# Altium PCB PCB1.PcbDoc (part 2 of 3)
Units mm, origin at the board's own origin, x right, y up, seen from the top; angles counter-clockwise.
Board outline 131 x 74 mm, 6 copper layers (Top Layer, Rele, Signals, +5V, GND, Bottom Layer), stack 1.732 mm thick; 176 components, 158 nets, 639 pads, 196 vias.
Unrouted connection lines stored in the file: 8.
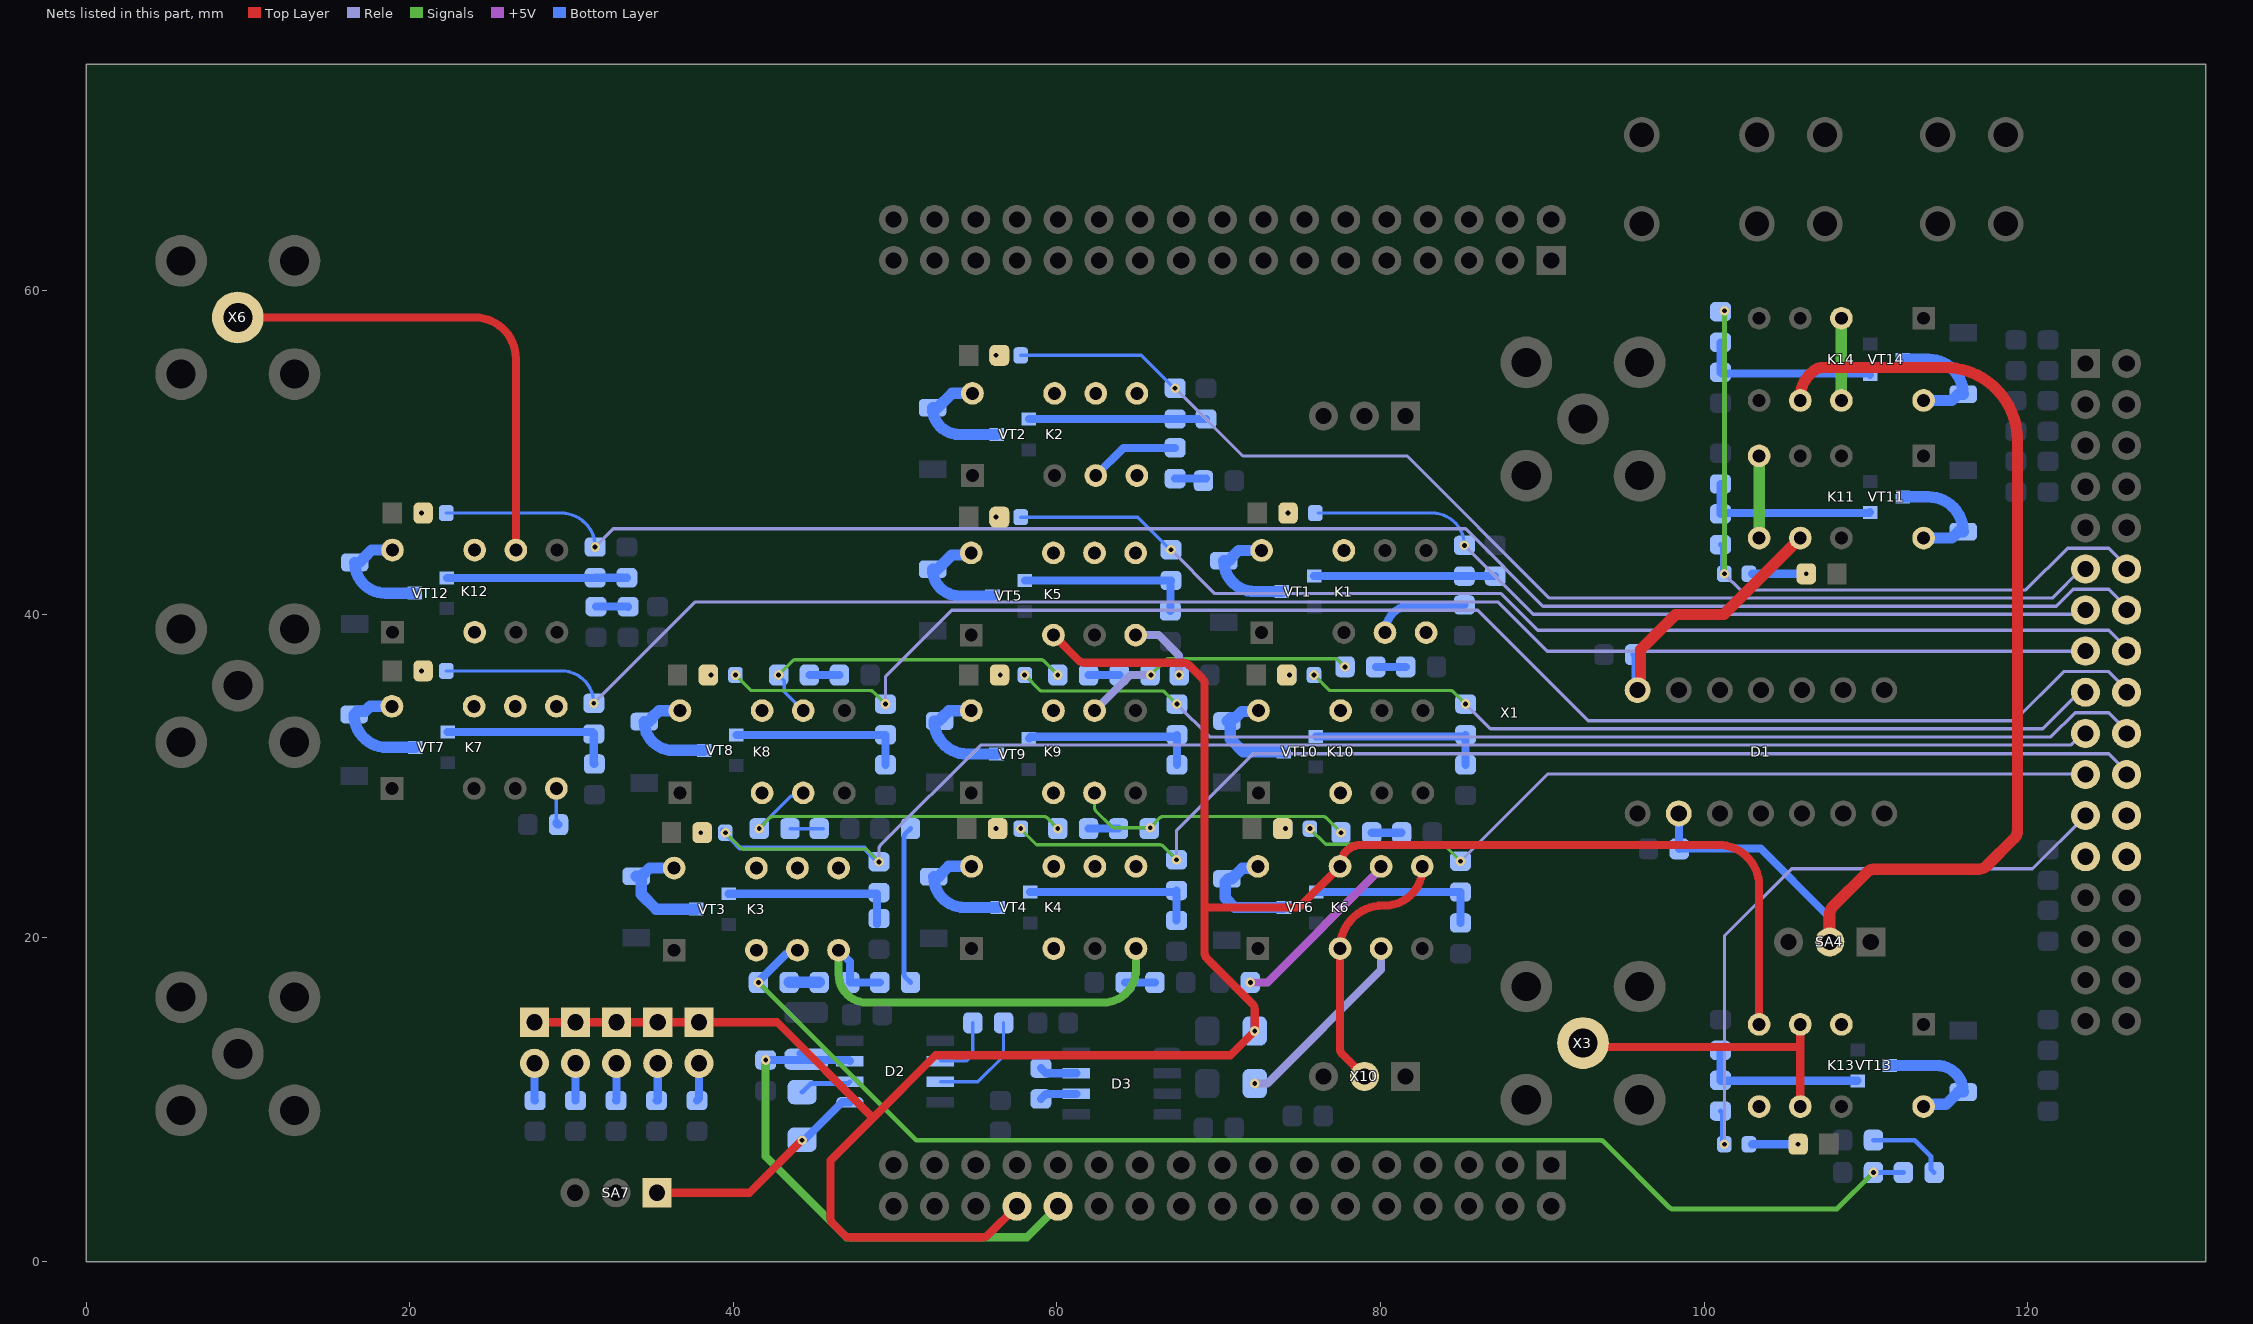
[diagram p6: the nets of this part, all layers, seen from the top]

## Via types
v1: diameter 0.6, hole 0.3, Top Layer to Bottom Layer, tented both sides, 196 vias

## Nets (pads, with @x,y where several pads share a name; then routed paths per layer and width w, separated by ;. In a path a pad name is that pad's centre, name@x,y a point inside that pad or via, vN(x,y) a via of type N, cw(c..) or ccw(c..) an arc to the next point about the centre after c; other vN are vias at no path point) (continued)
LOAD_BUF: D2.1 R25.1 SA7.1 | length 14.2
  Top Layer w0.5: SA7.1@35.29,4.25 41,4.25 v1(44.25,7.5)
  Bottom Layer w0.5: R25.1@44.25,7.53 44.4,7.53 46.715,9.845 D2.1@47.2,9.845
LOAD_F: C12.1 C13.1 D2.3 X1.37 | length 32.7
  Signals w0.5: v1(42,12.45) 42,6.5 47,1.5 58.14,1.5 X1.37@60.059,3.419
  Bottom Layer w0.5: v1(42,12.45) 44.5,12.45 C13.1@44.5,12.5 ; C13.1@44.146,12.854 C13.1@44.5,12.5 ; D2.3@47.2,12.385 47.143,12.443 44.557,12.443 C13.1@44.5,12.5
NetC9_1: C9.1 K2.4 | length 5.6
  Bottom Layer w0.5: K2.4@62.396,48.57 64.108,50.282 C9.1@67.299,50.282
NetC9_2: C9.2 R7.1 | length 1.9
  Bottom Layer w0.5: C9.2@67.299,48.382 R7.1@69.204,48.382
NetC10_1: C10.1 R8.2 | length 2
  Bottom Layer w0.5: C10.1@31.512,40.472 33.478,40.472 cw(c33.478,40.45) R8.2@33.5,40.45
NetC11_2: C11.2 R16.1 | length 1.9
  Bottom Layer w0.5: R16.1@64.2,17.25 C11.2@66.05,17.25
NetC16_2: C16.2 K3.4 R33.1 R83.2 | length 80.7
  Signals w0.3: v1(41.55,17.25) 51.3,7.5 93.563,7.5 cw(c93.563,7.2) 93.775,7.412 97.851,3.337 ccw(c98.062,3.55) 98.06,3.25 98.062,3.25 108.2,3.25 v1(110.45,5.5)
  Bottom Layer w0.3: v1(110.45,5.5) R83.2@112.3,5.5
  Bottom Layer w0.5: v1(41.55,17.25) 41.55,17.3 43.278,19.028 43.753,19.028 K3.4@43.963,19.238
NetD2_2: D2.2 R25.2 | length 3.2
  Bottom Layer w0.3: R25.2@44.25,10.47 44.78,11 47.085,11 D2.2@47.2,11.115
NetD2_6: D2.6 R26.1 | length 4.1
  Bottom Layer w0.2: D2.6@52.8,12.385 54.385,12.385 54.8,12.8 R26.1@54.8,14.75
NetD2_7: D2.7 R26.2 | length 6.6
  Bottom Layer w0.2: D2.7@52.8,11.115 55.115,11.115 56.7,12.7 R26.2@56.7,14.75
NetD3_6: D3.6 R27.1 | length 2.3
  Bottom Layer w0.5: R27.1@59,10.05 59.315,10.365 D3.6@61.2,10.365
NetD3_7: D3.7 R27.2 | length 2.3
  Bottom Layer w0.5: R27.2@59,11.95 59.315,11.635 D3.7@61.2,11.635
NetK1_4: K1.4 R6.1 | length 5.9
  Bottom Layer w0.5: K1.4@80.269,38.862 cw(c81.981,38.862) 81.981,40.574 R6.1@85.172,40.574
NetK1_5: K1.5
NetK1_10: K1.10
NetK1_12: K1.12 VD1.1 VT1.3 | length 7.3
  Bottom Layer w0.7: K1.12@72.649,43.942 71.223,43.942 70.813,43.532 70.813,43.502 70.613,43.302 VD1.1@70.313,43.302 ccw(c72.213,43.302) 72.213,41.402 VT1.3@73.885,41.402
NetK2_5: K2.5
NetK2_8: K2.8
NetK2_9: K2.9
NetK2_10: K2.10
NetK2_12: K2.12 VD3.1 VT2.3 | length 7.7
  Bottom Layer w0.7: K2.12@54.776,53.65 53.507,53.65 52.613,52.756 VD3.1@52.313,52.756 ccw(c53.959,52.756) 53.959,51.11 VT2.3@56.266,51.11
NetK3_3: K3.3
NetK3_8: K3.8
NetK3_9: K3.9
NetK3_10: K3.10
NetK3_12: K3.12 VD5.1 VT3.3 | length 7.5
  Bottom Layer w0.7: VD5.1@34.007,23.805 34.307,23.805 34.82,24.318 K3.12@36.343,24.318 ; VD5.1@34.107,23.805 34.307,23.605 34.307,22.693 35.222,21.778 VT3.3@37.706,21.778
NetK4_3: K4.3
NetK4_8: K4.8
NetK4_9: K4.9
NetK4_10: K4.10
NetK4_12: K4.12 VD7.1 VT4.3 | length 7.7
  Bottom Layer w0.7: K4.12@54.72,24.42 53.294,24.42 52.884,24.01 52.884,23.98 52.684,23.78 VD7.1@52.384,23.78 ccw(c54.284,23.78) 54.284,21.88 VT4.3@56.337,21.88
NetK5_5: K5.5 R17.2 | length 4.4
  Rele w0.5: K5.5@64.86,38.71 66.29,38.71 67.55,37.45 v1(67.55,36.25)
NetK5_8: K5.8
NetK5_9: K5.9
NetK5_10: K5.10
NetK5_12: K5.12 VD9.1 VT5.3 | length 7.4
  Bottom Layer w0.7: K5.12@54.7,43.79 54.566,43.656 53.496,43.656 52.617,42.777 VD9.1@52.317,42.777 ccw(c53.963,42.777) 53.963,41.131 VT5.3@56.016,41.131
NetK6_3: K6.3 K6.8 X10.2 | length 16.5
  Top Layer w0.5: K6.3@77.49,19.34 77.49,13.16 ccw(c77.99,13.16) 77.636,12.807 X10.2@79,11.443 ; K6.3@77.49,19.349 cw(c80.141,19.349) 80.141,22.001 80.269,22.001 ccw(c80.271,24.302) 82.57,24.417 K6.8@82.57,24.42
NetK6_4: K6.4 R9.1 | length 12
  Rele w0.5: v1(72.22,11) 73,11 80.03,18.03 K6.4@80.03,19.34
NetK6_12: K6.12 VD11.1 VT6.3 | length 7.2
  Bottom Layer w0.7: K6.12@72.41,24.42 72.293,24.303 71.453,24.303 70.803,23.653 70.602,23.653 70.399,23.45 70.399,22.46 70.979,21.88 VT6.3@73.977,21.88
NetK7_5: K7.5 R18.1 | length 2.3
  Bottom Layer w0.2: R18.1@29.063,27.137 K7.5@29.063,29.232
  Bottom Layer w0.5: R18.1@29.063,27.137 ccw(c29.2,27.137) R18.1@29.2,27
NetK7_8: K7.8
NetK7_9: K7.9
NetK7_10: K7.10
NetK7_12: K7.12 VD13.1 VT7.3 | length 7.5
  Bottom Layer w0.7: K7.12@18.903,34.312 18.897,34.318 17.568,34.318 17.249,33.999 16.767,33.999 VD13.1@16.567,33.799 ccw(c18.594,33.799) 18.594,31.772 VT7.3@20.343,31.772
NetK8_3: K8.3
NetK8_4: K8.4 R21.1 R79.2 | length 22.7
  Signals w0.2: v1(41.6,26.75) 42.292,27.442 cw(c42.433,27.3) 42.432,27.5 ; 42.433,27.5 59.217,27.5 cw(c59.217,27.3) 59.358,27.442 v1@60.049,26.751
  Bottom Layer w0.2: v1(41.6,26.75) 41.6,26.8 43.55,28.75 44.11,28.75 K8.4@44.32,28.96
  other v1: 60.05,26.75
NetK8_9: K8.9 R12.1 R77.2 | length 20.8
  Signals w0.2: v1(42.8,36.25) 43.678,37.128 cw(c43.819,36.986) 43.818,37.186 ; 43.819,37.186 59.031,37.186 cw(c59.031,36.986) 59.172,37.128 60.049,36.251 cw(c59.837,36.039) v1(60.05,36.25)
  Bottom Layer w0.2: v1(42.8,36.25) 43.15,35.9 43.15,35.21 K8.9@44.32,34.04
NetK8_10: K8.10
NetK8_12: K8.12 VD15.1 VT8.3 | length 7.2
  Bottom Layer w0.7: K8.12@36.7,34.04 35.402,34.04 34.992,33.63 34.992,33.563 34.792,33.363 VD15.1@34.492,33.363 ccw(c36.265,33.363) 36.265,31.59 VT8.3@38.191,31.59
NetK9_3: K9.3
NetK9_4: K9.4 R22.1 R80.2 | length 17.4
  Signals w0.2: K9.4@62.32,28.96 62.32,28.054 ccw(c62.62,28.054) 62.407,27.843 63.353,26.897 ccw(c63.564,27.11) 63.563,26.81 v1(65.76,26.81) 66.392,27.442 cw(c66.533,27.3) 66.532,27.5 ; 66.533,27.5 76.467,27.5 cw(c76.467,27.3) 76.608,27.442 77.493,26.557 v1(77.55,26.5)
NetK9_9: K9.9 R13.1 R78.2 | length 17
  Signals w0.2: v1(65.8,36.25) 66.742,37.192 cw(c66.883,37.05) 66.882,37.25 ; 66.883,37.25 77.217,37.25 cw(c77.217,37.05) 77.358,37.192 77.786,36.764 v1(77.8,36.75)
  Rele w0.5: K9.9@62.32,34.04 64.53,36.25 v1(65.8,36.25)
NetK9_10: K9.10
NetK9_12: K9.12 VD17.1 VT9.3 | length 7.6
  Bottom Layer w0.7: K9.12@54.7,34.04 53.318,34.04 52.908,33.63 52.908,33.6 52.708,33.4 52.408,33.4 ccw(c54.448,33.4) 54.448,31.36 VT9.3@56.26,31.36
NetK10_3: K10.3
NetK10_10: K10.10
NetK10_12: K10.12 VD19.1 VT10.3 | length 7
  Bottom Layer w0.7: VD19.1@70.5,33.4 70.512,33.4 70.712,33.2 70.712,32.288 71.5,31.5 VT10.3@74,31.5 ; VD19.1@70.55,33.4 70.75,33.6 71.028,33.6 71.421,33.994 72.404,33.994 K10.12@72.45,34.04
NetK11_5: K11.5 K11.8 | length 5.1
  Signals w0.7: K11.8@103.39,44.71 K11.5@103.39,49.79
NetK11_12: K11.12 VD21.1 VT11.3 | length 7.6
  Bottom Layer w0.7: VT11.3@112.25,47.25 113.85,47.25 cw(c113.85,45.1) VD21.1@116,45.1 115.7,45.1 115.31,44.71 K11.12@113.55,44.71
NetK12_3: K12.3
NetK12_10: K12.10
NetK12_12: K12.12 VD23.1 VT12.3 | length 7.4
  Bottom Layer w0.7: K12.12@18.939,43.967 17.649,43.967 17.2,43.518 17.2,43.497 16.903,43.2 VD23.1@16.603,43.2 ccw(c18.503,43.2) 18.503,41.3 VT12.3@20.302,41.3
NetK13_3: K13.3
NetK13_8: K13.8
NetK13_12: K13.12 VD25.1 VT13.3 | length 8.3
  Bottom Layer w0.7: VT13.3@111.47,12.12 114.354,12.12 cw(c114.354,10.474) VD25.1@116,10.474 115.7,10.474 114.94,9.714 113.684,9.714 K13.12@113.55,9.58
NetK14_3: K14.3 K14.10 | length 5.1
  Signals w0.7: K14.10@108.47,53.21 K14.3@108.47,58.29
NetK14_12: K14.12 VD27.1 VT14.3 | length 7.6
  Bottom Layer w0.7: VT14.3@112.25,55.75 113.85,55.75 cw(c113.85,53.6) VD27.1@116,53.6 115.7,53.6 115.31,53.21 K14.12@113.55,53.21
NetR11_1: R11.1 R12.2 | length 1.9
  Bottom Layer w0.5: R12.2@44.7,36.25 R11.1@46.55,36.25
NetR13_2: R13.2 R77.1 | length 1.9
  Bottom Layer w0.5: R77.1@61.95,36.25 R13.2@63.85,36.25
NetR14_2: R14.2 R78.1 | length 1.9
  Bottom Layer w0.5: R78.1@79.7,36.75 R14.2@81.55,36.75
NetR20_1: R20.1 R21.2 | length 2.1
  Bottom Layer w0.2: R21.2@43.5,26.75 R20.1@45.55,26.75
NetR22_2: R22.2 R79.1 | length 1.9
  Bottom Layer w0.5: R79.1@61.95,26.75 R22.2@63.8,26.75
NetR23_2: R23.2 R80.1 | length 1.9
  Bottom Layer w0.5: R80.1@79.45,26.5 R23.2@81.3,26.5
NetR24_1: R24.1 SA1.2 | length 2.3
  Bottom Layer w0.5: SA1.2@27.71,12.25 27.71,9.95 R24.1@27.75,9.95
NetR28_1: R28.1 SA2.2 | length 2.3
  Bottom Layer w0.5: R28.1@30.25,9.95 SA2.2@30.25,12.25
NetR29_1: R29.1 SA3.2 | length 2.3
  Bottom Layer w0.5: R29.1@32.75,9.95 32.79,9.95 SA3.2@32.79,12.25
NetR30_1: R30.1 SA5.2 | length 2.4
  Bottom Layer w0.5: R30.1@35.25,9.95 35.33,9.95 SA5.2@35.33,12.25
NetR31_1: R31.1 SA6.2 | length 2.3
  Bottom Layer w0.5: R31.1@37.75,9.95 37.87,10.07 SA6.2@37.87,12.25
NetR32_2: R32.2 R81.1 | length 9.8
  Bottom Layer w0.3: R32.2@50.634,17.566 R32.2@50.95,17.25 ; R32.2@50.633,17.567 cw(c50.846,17.778) 50.546,17.778 50.546,26.222 cw(c50.846,26.222) 50.634,26.434 R81.1@50.95,26.75
NetR33_2: R33.2 R82.1 | length 1.9
  Bottom Layer w0.7: R33.2@43.45,17.25 R82.1@45.3,17.25
NetR34_2: R34.2 R83.1 | length 5
  Bottom Layer w0.3: R34.2@110.45,7.5 113,7.5 114,6.5 114,5.7 R83.1@114.2,5.5
NetR35_2: R35.2 R36.1 VT1.1 | length 11.2
  Bottom Layer w0.5: VT1.1@75.885,42.352 85.172,42.352 87.077,42.352 R36.1@87.077,42.357
NetR37_2: R37.2 VD2.1
  other v1: 74.28,46.25
NetR38_2: R38.2 R39.1 VT2.1 | length 10.9
  Bottom Layer w0.5: VT2.1@58.266,52.06 58.268,52.062 67.296,52.062 R38.2@67.299,52.065 R39.1@69.204,52.065
NetR40_2: R40.2 VD4.1
  other v1: 56.24,56
NetR41_2: R41.2 R42.1 VT3.1 | length 11
  Bottom Layer w0.5: VT3.1@39.706,22.728 R41.2@48.866,22.728 ; R42.1@48.866,20.851 R41.2@48.866,22.728 ; R41.2@48.866,22.733 R41.2@48.866,22.728
NetR43_2: R43.2 VD6.1
  other v1: 37.99,26.5
NetR44_2: R44.2 R45.1 VT4.1 | length 10.9
  Bottom Layer w0.5: VT4.1@58.337,22.83 67.295,22.83 R44.2@67.391,22.926 R45.1@67.391,21.076
NetR46_2: R46.2 VD8.1
  other v1: 56.24,26.75
NetR47_2: R47.2 R48.1 VT5.1 | length 10.9
  Bottom Layer w0.5: VT5.1@58.016,42.081 58.018,42.083 R47.2@67.046,42.083 ; R48.1@67,40.2 67.024,40.224 67.024,42.061 R47.2@67.046,42.083 ; R47.2@67.049,42.086 R47.2@67.046,42.083
NetR49_2: R49.2 VD10.1
  other v1: 56.24,46
NetR50_2: R50.2 R51.1 VT6.1 | length 10.8
  Bottom Layer w0.5: VT6.1@76.027,22.83 76.03,22.833 84.931,22.833 R50.2@84.933,22.835 R51.1@84.933,20.925
NetR52_2: R52.2 VD12.1
  other v1: 74.11,26.75
NetR53_2: R53.2 R54.1 VT7.1 | length 11
  Bottom Layer w0.5: VT7.1@22.343,32.722 31.254,32.722 cw(c31.254,32.6) R53.2@31.376,32.6 31.376,30.782 ccw(c31.408,30.782) R54.1@31.408,30.75
NetR55_2: R55.2 VD14.1
  other v1: 20.74,36.5
NetR56_2: R56.2 R57.1 VT8.1 | length 11.1
  Bottom Layer w0.5: VT8.1@40.191,32.54 40.196,32.545 49.403,32.545 R56.2@49.408,32.55 R57.1@49.408,30.7
NetR58_2: R58.2 VD16.1
  other v1: 38.61,36.25
NetR59_2: R59.2 R60.1 VT9.1 | length 11.1
  Bottom Layer w0.5: VT9.1@58.26,32.31 58.38,32.43 67.288,32.43 R59.2@67.408,32.55 R60.1@67.408,30.7
NetR61_2: R61.2 VD18.1
  other v1: 56.49,36.25
NetR62_2: R62.2 R63.1 VT10.1 | length 11.2
  Bottom Layer w0.5: VT10.1@76,32.45 85.15,32.45 ccw(c85.15,32.55) R62.2@85.25,32.55 R63.1@85.25,30.7
NetR64_2: R64.2 VD20.1
  other v1: 74.36,36.25
NetR65_2: R65.2 R66.1 VT11.1 | length 11.1
  Bottom Layer w0.5: R66.1@101,48.05 R65.2@101,46.2 101.05,46.25 110.2,46.25 VT11.1@110.25,46.3
NetR67_2: R67.2 VD22.1 | length 3.4
  Bottom Layer w0.5: R67.2@102.95,42.5 v1(106.3,42.5)
NetR68_2: R68.2 R69.1 VT12.1 | length 11.1
  Bottom Layer w0.5: VT12.1@22.302,42.25 R68.2@31.457,42.25 ; R68.2@31.462,42.255 R69.1@33.417,42.255
NetR70_2: R70.2 VD24.1
  other v1: 20.74,46.25
NetR71_2: R71.2 R72.1 VT13.1 | length 10.3
  Bottom Layer w0.5: R72.1@101,13.05 R71.2@101,11.2 ccw(c101.03,11.2) 101.03,11.17 VT13.1@109.47,11.17
NetR73_2: R73.2 VD26.1 | length 2.8
  Bottom Layer w0.5: R73.2@102.95,7.25 v1(105.8,7.25)
NetR74_2: R74.2 R75.1 VT14.1 | length 11.2
  Bottom Layer w0.5: R74.2@101,56.8 R75.1@101,54.95 101.075,54.875 110.175,54.875 VT14.1@110.25,54.8
NetR76_2: 
NetX1_IN-OUT7: X1.IN-OUT7
NetX1_IN-OUT8: X1.IN-OUT8
NetX1_OUT8: X1.OUT8
OSC: K12.9 X6.1 | length 30.5
  Top Layer w0.5: X6.1@9.38,58.339 24.019,58.339 cw(c24.019,55.799) 26.559,55.799 K12.9@26.559,43.967
OUT: K5.3 K6.10 K13.5 R15.1 SA1.1 SA2.1 SA3.1 SA5.1 SA6.1 X1.36 | length 148.7
  Top Layer w0.5: SA1.1@27.71,14.79 SA3.1@32.79,14.79 SA5.1@35.33,14.79 SA6.1@37.87,14.79 39.37,14.79 42.71,14.79 48.625,8.875 ; X1.36@57.519,3.419 55.746,1.646 cw(c55.393,2) 55.393,1.5 47.206,1.5 cw(c47.207,2) 46.855,1.645 46.146,2.354 cw(c46.5,2.707) 46,2.707 46,6.25 48.625,8.875 ; K5.3@59.78,38.71 61.344,37.146 61.345,37.145 ccw(c61.697,37.5) 61.697,37 67.793,37 cw(c67.793,36.5) 68.147,36.853 68.981,36.019 cw(c68.627,35.666) 69.127,35.666 69.127,21.88 ; K13.5@103.39,14.66 103.39,23.21 ccw(c100.85,23.21) 100.85,25.75 78.82,25.75 ccw(c78.82,24.42) K6.10@77.49,24.42 75.096,22.026 cw(c74.743,22.38) 74.743,21.88 69.127,21.88 ; 48.625,8.875 52.5,12.75 70.72,12.75 v1(72.22,14.25) 72.22,15.573 ccw(c71.72,15.573) 72.074,15.926 69.273,18.727 cw(c69.627,19.08) 69.127,19.08 69.127,21.88
RELE1: R38.1 R40.1 X1.OUT1 | length 72.9
  Rele w0.2: v1(67.299,53.965) 71.486,49.778 81.651,49.778 90.429,41 121.5,41 123.327,42.827 X1.OUT1@123.71,42.827
  Bottom Layer w0.2: R40.1@57.76,56 65.214,56 67.249,53.965 v1(67.299,53.965)
RELE2: R65.1 R67.1 R74.1 X1.IN-OUT1 | length 45.2
  Signals w0.3: v1(101.24,42.5) 101.245,42.505 101.245,58.745 v1(101.25,58.75)
  Rele w0.2: v1@101.24,42.481 102.221,41.5 119.872,41.5 122.45,44.077 125,44.077 X1.IN-OUT1@126.25,42.827
  Bottom Layer w0.3: R65.1@101,44.3 101.12,44.18 101.12,42.62 v1(101.24,42.5)
RELE3: R35.1 R37.1 X1.OUT2 | length 50.4
  Rele w0.2: v1(85.172,44.257) 89.429,40 123.3,40 X1.OUT2@123.559,40.259
  Bottom Layer w0.2: R37.1@76.15,46.25 83.179,46.25 cw(c83.179,44.257) v1(85.172,44.257)
RELE4: R68.1 R70.1 X1.IN-OUT2 | length 108.6
  Rele w0.2: v1(31.462,44.155) 32.585,45.278 85.249,45.278 90.027,40.5 121.75,40.5 122.787,41.537 125,41.537 X1.IN-OUT2@126.25,40.287
  Bottom Layer w0.2: R70.1@22.26,46.25 29.367,46.25 cw(c29.367,44.155) v1(31.462,44.155)
RELE5: R53.1 R55.1 X1.OUT3 | length 106.3
  Rele w0.2: v1(31.376,34.5) 37.626,40.75 87.265,40.75 90.296,37.719 X1.OUT3@123.559,37.719
  Bottom Layer w0.2: R55.1@22.26,36.5 29.376,36.5 cw(c29.376,34.5) v1(31.376,34.5)
RELE6: R47.1 R49.1 X1.IN-OUT3 | length 71.9
  Rele w0.2: v1(67.049,43.986) 69.757,41.278 87.444,41.278 89.713,39.009 124.988,39.009 X1.IN-OUT3@126.25,37.747
  Bottom Layer w0.2: R49.1@57.76,46 64.985,46 66.999,43.986 v1(67.049,43.986)
RELE7: R62.1 R64.1 X1.OUT4 | length 50.1
  Signals w0.2: v1(75.88,36.25) 76.85,35.28 84.337,35.28 cw(c84.337,35.08) 84.478,35.222 v1(85.25,34.45)
  Rele w0.2: v1(85.25,34.45) 86.783,32.917 120.917,32.917 123.207,35.207 X1.OUT4@123.71,35.207
RELE8: R56.1 R58.1 X1.IN-OUT4 | length 94.9
  Signals w0.2: v1(40.13,36.25) 41.1,35.28 48.454,35.28 cw(c48.454,34.98) 48.666,35.192 v1(49.408,34.45)
  Rele w0.2: v1(49.408,34.45) 49.408,36.158 53.5,40.25 86,40.25 92.833,33.417 119.167,33.417 122.207,36.457 125,36.457 X1.IN-OUT4@126.25,35.207
RELE9: R41.1 R43.1 X1.OUT5 | length 99.3
  Signals w0.2: v1@39.439,26.571 v1(39.51,26.5) 40.423,25.587 ccw(c40.634,25.8) 40.633,25.5 48.117,25.5 cw(c48.117,25.3) 48.258,25.442 v1(49,24.7)
  Rele w0.2: v1(49,24.7) 49,25.503 cw(c49.3,25.503) 49.088,25.715 55.29,31.917 122.633,31.917 123.383,32.667 X1.OUT5@123.71,32.667
  Bottom Layer w0.3: R43.1@39.34,26.67 v1(39.51,26.5) 39.51,26.45 39.96,26 40.41,25.55 48.1,25.55 48.866,24.784 R41.1@48.866,24.633
RELE10: R59.1 R61.1 X1.IN-OUT5 | length 71
  Signals w0.2: v1(58,36.25) 58.942,35.308 ccw(c59.083,35.45) 59.082,35.25 66.525,35.25 cw(c66.525,35.05) 66.666,35.192 v1@67.408,34.451
  Rele w0.2: v1(67.408,34.45) 69.441,32.417 121.417,32.417 122.917,33.917 125,33.917 X1.IN-OUT5@126.25,32.667
RELE11: R50.1 R52.1 X1.OUT6 | length 51.1
  Signals w0.2: v1(75.63,26.75) 76.6,25.78 83.805,25.78 cw(c83.805,25.58) 83.946,25.722 v1(84.933,24.735)
  Rele w0.2: v1(84.933,24.735) 90.325,30.127 X1.OUT6@123.71,30.127
RELE12: R44.1 R46.1 X1.IN-OUT6 | length 73.6
  Signals w0.2: v1(57.76,26.75) 57.796,26.714 ccw(c57.985,26.779) 57.843,26.638 58.673,25.808 ccw(c58.814,25.95) 58.813,25.75 66.384,25.75 cw(c66.384,25.55) 66.526,25.691 v1(67.391,24.826)
  Rele w0.2: v1(67.391,24.826) 67.391,26.641 72.125,31.375 125.001,31.375 X1.IN-OUT6@126.25,30.127
RELE13: R71.1 R73.1 X1.OUT7 | length 40.4
  Rele w0.2: v1(101.24,7.25) 101.24,20.118 105.401,24.278 120.278,24.278 X1.OUT7@123.559,27.559
  Bottom Layer w0.3: R71.1@101,9.3 101.12,9.18 101.12,7.37 v1(101.24,7.25)
TP2: K3.5 K4.5 R32.1 R82.2 | length 27.5
  Signals w0.5: K3.5@46.503,19.238 46.503,17.747 ccw(c48.25,17.747) 48.25,16 62.84,16 ccw(c62.84,18.04) 64.88,18.04 K4.5@64.88,19.34
  Bottom Layer w0.5: K3.5@46.503,19.238 46.503,19.226 47.2,18.529 R82.2@47.2,17.25 R32.1@49.05,17.25
V+: C14.1 D1.7 K11.9 | length 17.5
  Top Layer w0.7: D1.7@95.88,35.31 96.052,35.482 96.052,37.802 98.234,39.984 101.204,39.984 K11.9@105.93,44.71
  Bottom Layer w0.5: C14.1@95.7,37.5 95.744,37.456 95.744,35.354 D1.7@95.788,35.31
V-: C15.1 D1.9 K14.9 SA4.2 | length 71.9
  Top Layer w0.7: K14.9@105.942,53.211 cw(c107.938,53.408) 106.968,55.163 cw(c107.307,54.55) 107.307,55.25 114.851,55.25 cw(c114.852,50.752) 119.35,50.764 cw(c114.852,50.752) 119.35,50.76 119.35,26.678 cw(c112.507,26.683) 119.35,26.634 cw(c118.65,26.64) 119.146,26.146 117.455,24.455 cw(c116.96,24.95) 116.96,24.25 110.54,24.25 ccw(c110.54,23.55) 110.045,24.045 107.953,21.953 ccw(c108.45,21.46) 107.75,21.462 SA4.2@107.75,19.75
  Bottom Layer w0.5: D1.9@98.42,27.69 98.435,27.675 98.435,25.515 C15.1@98.45,25.5 ; C15.1@98.443,25.515 103.485,25.515 107.6,21.4 107.6,19.9 SA4.2@107.75,19.75
VO_AD: K6.9 R19.1 | length 11.1
  +5V w0.5: v1(71.95,17.25) 73,17.25 80.03,24.28 K6.9@80.03,24.42
VOLT: K13.4 K13.9 X3.1 | length 18.6
  Top Layer w0.5: X3.1@92.5,13.5 92.75,13.25 105.93,13.25 ; K13.9@105.93,9.58 105.93,13.25 ; K13.4@105.93,14.66 105.93,13.25
pads on no net: D1.1 D1.2 D1.3 D1.12 D1.13 D1.14 X1.1 X1.2 X1.3 X1.4 X1.5 X1.6 X1.7 X1.8 X1.9 X1.10 X1.11 X1.12 X1.13 X1.14 X1.15 X1.16 X1.17 X1.18 X1.19 X1.20 X1.21 X1.22 X1.23 X1.24 X1.25 X1.26 X1.27 X1.28 X1.29 X1.30 X1.31 X1.32 X1.33 X1.34 X1.35 X1.39 X1.40 X1.41 X1.42 X1.43 X1.44 X1.45 X1.46 X1.47 X1.48 X1.52 X1.53 X1.54 X1.55 X1.56 X1.57 X1.58 X1.59 X1.60 X1.61 X1.62 X1.63 X1.64 X1.NC X1.VDDF X1.VDDS X11.3

## Polygon pours and split planes (outlines as drawn)
GND on Signals "NONET_L-01_P-001" (solid, remove dead copper, pour order 3): 1,73 1,1 130,1 130,73
GND on Bottom Layer "NONET_L-01_P-001" (solid, remove dead copper, pour order 1): 1,73 1,1 130,1 130,73
GND on Top Layer "NONET_L-01_P-001" (solid, remove dead copper, pour order 2): 1,73 1,1 130,1 130,73
GND on GND "NONET_L-01_P-001" (solid, remove dead copper, pour order 0): 1,73 1,1 130,1 130,73

## Other copper
Top Layer:
  pour cut-out: 78.958,43.942 78.958,41 80,41
  pour cut-out: 106.838,14.66 106.838,9.58 105.93,9.58
  pour cut-out: 11.591,35.589 11.591,37.25 10.5,37.25
  pour cut-out: 44.32,35.351 43,35.351 43,34.5
  pour cut-out: 41.892,36.25 41.892,34 42.5,34
  pour cut-out: 43.708,36.25 43.708,34 43.25,34
  pour cut-out: 41.78,33.132 44.32,33.132 44.32,34.04
  pour cut-out: 78.759,34.04 78.759,28.96 80.07,28.96
  pour cut-out: 64.86,32.729 69.25,32.729 69.25,34.25
  pour cut-out: 46.86,32.729 44.32,32.729 44.32,34.04
  pour cut-out: 44.32,35.351 46.86,35.351 46.86,34.04
  pour cut-out: 41.78,28.052 44.32,28.052 44.32,28.96
  pour cut-out: 41.78,29.868 44.32,29.868 44.32,28.96
  pour cut-out: 44.32,27.649 46.86,27.649 46.86,28.96
  pour cut-out: 44.32,30.271 46.86,30.271 46.86,28.96
  pour cut-out: 46.292,26.75 46.292,28.96 46.86,28.96
  pour cut-out: 48.108,26.75 48.108,28.96 46.86,28.96
  pour cut-out: 56.5,9.44 55.25,9.44 55.25,10.5
  pour cut-out: 57.01,9.95 57.01,12.75 56.5,12.75
  pour cut-out: 55.992,7.068 55.992,12.75 53.25,12.75
  pour cut-out: 76.418,38.862 76.418,40.979 77.729,40.979
  pour cut-out: 62.34,18.029 64.88,18.029 64.88,19.34
  pour cut-out: 62.34,20.651 64.88,20.651 64.88,19.34
  pour cut-out: 64.852,26.81 64.852,29 65,29
  pour cut-out: 66.171,28.96 66.171,26.81 65.76,26.81
  pour cut-out: 62.32,27.649 64.86,27.649 64.86,28.96
  pour cut-out: 62.32,30.271 64.86,30.271 64.86,28.96
  pour cut-out: 67.408,33.94 65,33.94 65,34.5
  pour cut-out: 62.32,32.729 64.86,32.729 64.86,34.04
  pour cut-out: 59.78,33.132 62.32,33.132 62.32,34.04
  pour cut-out: 59.142,36.25 59.142,34.04 59.78,34.04
  pour cut-out: 61.009,34.04 61.009,37 62.25,37
  pour cut-out: 61.697,36.138 60.25,36.138 60.25,36.75
  pour cut-out: 59.142,36.25 59.142,38.71 59.78,38.71
  pour cut-out: 29.099,45.278 26.559,45.278 26.559,43.967
  pour cut-out: 26.559,42.656 29.099,42.656 29.099,43.967
  pour cut-out: 23.111,38.887 23.111,41.75 24.25,41.75
  pour cut-out: 24.019,37.979 26.559,37.979 26.559,38.887
  pour cut-out: 38.933,13.29 43.25,13.29 43.25,14.358
  pour cut-out: 38.979,12.25 38.979,14.75 38,14.75
  pour cut-out: 27.71,11.141 37.87,11.141 37.87,12.25
  pour cut-out: 26.601,12.25 26.601,14.79 27.71,14.79
  pour cut-out: 60.059,2.31 57.519,2.31 57.519,3.419
  pour cut-out: 61.168,5.959 61.168,3.419 60.059,3.419
  pour cut-out: 57.519,7.068 60.059,7.068 60.059,5.959
  pour cut-out: 57.519,7.068 54.979,7.068 54.979,5.959
  pour cut-out: 54.979,7.466 46,7.466 46,6.25
  pour cut-out: 81.413,10.289 79,10.289 79,11.443
  pour cut-out: 81.413,12.597 79.25,12.597 79.25,12
  pour cut-out: 76.179,19.34 76.179,21.5 76.75,21.5
  pour cut-out: 78.801,19.34 78.801,21 78,21
  pour cut-out: 108.47,10.891 105.93,10.891 105.93,9.58
  pour cut-out: 105.93,8.672 108.47,8.672 108.47,9.58
  pour cut-out: 107.827,8.154 107.827,9.58 108.47,9.58
  pour cut-out: 107.827,6.346 107.827,5.5 108.55,5.5
  pour cut-out: 97.411,35.31 97.411,32 98.25,32
  pour cut-out: 98.42,36.319 100.96,36.319 100.96,35.31
  pour cut-out: 103.373,36.356 100.96,36.356 100.96,35.31
  pour cut-out: 103.373,34.264 100.96,34.264 100.96,35.31
  pour cut-out: 103.373,28.736 101.5,28.736 101.5,28.25
  pour cut-out: 103.364,26.867 103.364,24.997 102.94,24.997
  pour cut-out: 94.468,27.69 94.468,31.25 95.5,31.25
  pour cut-out: 94.468,27.69 94.468,25.75 95.25,25.75
  pour cut-out: 76.642,26.5 76.642,25.25 77.25,25.25
  pour cut-out: 83.921,28.96 83.921,31 83.25,31
  pour cut-out: 80.07,27.649 82.61,27.649 82.61,28.96
  pour cut-out: 78.759,34.04 78.759,36.25 79.5,36.25
  pour cut-out: 83.921,34.04 83.921,32 83.5,32
  pour cut-out: 83.921,34.04 83.921,36.5 83.25,36.5
  pour cut-out: 76.892,36.75 76.892,38.882 77.732,38.882
  pour cut-out: 77.8,35.842 80.25,35.842 80.25,36.5
  pour cut-out: 62.396,47.662 59.856,47.662 59.856,48.57
  pour cut-out: 62.396,49.478 59.856,49.478 59.856,48.57
  pour cut-out: 60.688,43.79 60.688,48.57 59.856,48.57
  pour cut-out: 15.157,39.439 15.157,41.75 14.5,41.75
  pour cut-out: 11.189,35.589 11.189,37.25 10.25,37.25
  pour cut-out: 12.53,36.812 9.25,36.812 9.25,38.25
  pour cut-out: 117.316,64.125 117.316,67 118.5,67
  pour cut-out: 89,46.753 96,46.753 96,48.562
  pour cut-out: 89,57.371 96,57.371 96,55.562
  pour cut-out: 87.191,48.562 87.191,55.562 89,55.562
  pour cut-out: 56.75,46.86 58,46.86 58,46.5
  pour cut-out: 56.75,45.14 58,45.14 58,45.75
  pour cut-out: 45.143,6.25 45.143,12.25 46,12.25
  pour cut-out: 52.5,13.607 44.75,13.607 44.75,12.5
  pour cut-out: 72.46,17.25 72.46,16.5 72.25,16.5
  pour cut-out: 79.361,43.942 79.361,41 80.5,41
  pour cut-out: 77.729,37.954 80.269,37.954 80.269,38.862
  pour cut-out: 79.162,34.04 79.162,41 80,41
  pour cut-out: 107.562,49.79 107.562,51.25 108.25,51.25
  pour cut-out: 106,41.64 103,41.64 103,42
  pour cut-out: 107.11,42.15 107.11,44.71 105.93,44.71
  pour cut-out: 45.138,2.707 45.138,0.5 46,0.5
  pour cut-out: 57.76,26.24 56.24,26.24 56.24,26.75
  pour cut-out: 57.76,27.26 56.24,27.26 56.24,26.75
  pour cut-out: 60.688,43.79 60.688,41 59.75,41
  pour cut-out: 123.152,56.599 127.75,56.599 127.75,55.75
  pour cut-out: 97.809,48.562 97.809,46.5 97.25,46.5
  pour cut-out: 105.083,20.897 103.5,20.897 103.5,20.5
  pour cut-out: 105.083,18.603 103.5,18.603 103.5,19.25
  pour cut-out: 76.582,19.34 76.582,21.5 77.5,21.5
  pour cut-out: 78.82,26.611 77.55,26.611 77.55,26.5
  pour cut-out: 77.04,26.5 77.04,24.42 77.49,24.42
  pour cut-out: 65.8,35.74 67.55,35.74 67.55,36.25
  pour cut-out: 39.51,25.99 37.99,25.99 37.99,26.5
  pour cut-out: 39.51,27.01 38.08,27.01 38.08,26.5
  pour cut-out: 26.61,15.89 38.97,15.89 38.97,13.69 26.61,13.69
  pour cut-out: 48.79,3.419 48.79,1.5 49.75,1.5
  pour cut-out: 126.099,49.31 123.559,49.31 123.559,50.419
  pour cut-out: 122.45,50.419 122.45,52.959 123.559,52.959
  pour cut-out: 122.45,52.959 122.45,55.499 123.559,55.499
  pour cut-out: 97.809,48.562 97.809,55.562 96,55.562
  pour cut-out: 105.483,54.118 105.483,58.29 105.93,58.29
  pour cut-out: 109.378,53.21 109.378,49.79 108.47,49.79
  pour cut-out: 109.378,53.21 109.378,55.25 108,55.25
  pour cut-out: 103.39,54.118 105.942,54.118 105.942,53.211
  pour cut-out: 102.482,53.21 102.482,51.75 103,51.75
  pour cut-out: 108.47,43.802 105.93,43.802 105.93,44.71
  pour cut-out: 102.482,44.71 102.482,41.825 103,41.825
  pour cut-out: 102.482,44.71 102.482,46.25 103.39,46.25
  pour cut-out: 107.75,18.641 110.29,18.641 110.29,19.75
  pour cut-out: 105.93,15.568 103.39,15.568 103.39,14.66
  pour cut-out: 102.482,14.66 102.482,13 103.39,13
  pour cut-out: 101.776,34.731 101.776,27.69 100.96,27.69
  pour cut-out: 102.04,27.467 102.04,25.75 100.85,25.75
  pour cut-out: 95.88,28.699 100.96,28.699 100.96,27.69
  pour cut-out: 94.871,27.69 94.871,25.75 95.63,25.75
  pour cut-out: 79.162,34.04 79.162,28.96 80.07,28.96
  pour cut-out: 84.933,24.225 82.57,24.225 82.57,24.42
  pour cut-out: 74.743,21.018 78.605,21.018 78.605,21.51
  pour cut-out: 76.628,13.16 76.628,11.75 77.25,11.75
  pour cut-out: 76.46,10.334 79,10.334 79,11.443
  pour cut-out: 58.628,3.419 58.628,0.75 56.75,0.75
  pour cut-out: 49.899,4.528 57.519,4.528 57.519,3.419
  pour cut-out: 67.408,33.94 68.75,33.94 68.75,34.5
  pour cut-out: 66.898,34.45 66.898,36.388 67.62,36.388
  pour cut-out: 65.768,38.71 65.768,37 65.25,37
  pour cut-out: 65.768,38.71 65.768,40.75 65,40.75
  pour cut-out: 58.872,38.71 58.872,41 59.75,41
  pour cut-out: 59.78,42.882 58,42.882 58,43.857
  pour cut-out: 59.78,44.698 58,44.698 58,43.857
  pour cut-out: 57.394,47.32 57.394,46.5 56.75,46.5
  pour cut-out: 14.707,39.452 14.707,41.75 13.5,41.75
  pour cut-out: 13.69,39.235 9.75,39.235 9.75,40.75
Signals:
  pour cut-out: 44.029,36.48 44.029,35.25 43.25,35.25
  pour cut-out: 107.642,5.5 107.642,3.25 108.145,3.25
  pour cut-out: 110.45,6.01 108.55,6.01 108.55,5.5
  pour cut-out: 76.418,38.862 76.418,37.5 77,37.5
  pour cut-out: 46.79,15.25 46.79,16 47.25,16
  pour cut-out: 73.851,36.25 73.851,37 74.25,37
  pour cut-out: 68.06,36.25 68.06,36.75 67.25,36.75
  pour cut-out: 55.98,36.25 55.98,37 56.25,37
  pour cut-out: 56.25,39.25 56.25,37.75 58.25,37.75 58.25,39
  pour cut-out: 85.172,37.766 88.25,37.766 88.25,38.5
  pour cut-out: 84.264,38.674 84.264,41.5 85.5,41.5
  pour cut-out: 103.373,34.264 100.96,34.264 100.96,35.31
  pour cut-out: 103.373,36.356 100.96,36.356 100.96,35.31
  pour cut-out: 98.42,34.301 100.96,34.301 100.96,35.31
  pour cut-out: 98.42,36.319 100.96,36.319 100.96,35.31
  pour cut-out: 103.373,26.644 100.96,26.644 100.96,27.69
  pour cut-out: 103.373,28.736 100.96,28.736 100.96,27.69
  pour cut-out: 98.42,28.699 100.96,28.699 100.96,27.69
  pour cut-out: 98.42,26.681 100.96,26.681 100.96,27.69
  pour cut-out: 98.42,26.681 95.88,26.681 95.88,27.69
  pour cut-out: 98.42,28.699 95.88,28.699 95.88,27.69
  pour cut-out: 38.979,12.25 38.979,14.79 37.87,14.79
  pour cut-out: 27.71,11.141 37.87,11.141 37.87,12.25
  pour cut-out: 26.601,12.25 26.601,14.79 27.71,14.79
  pour cut-out: 61.029,19.34 61.029,16 62.25,16
  pour cut-out: 62.34,20.651 64.88,20.651 64.88,19.34
  pour cut-out: 76.179,24.42 76.179,26.5 77.55,26.5
  pour cut-out: 82.57,23.109 77.49,23.109 77.49,24.42
  pour cut-out: 83.921,28.96 83.921,24.419 82.57,24.419
  pour cut-out: 85.814,38.032 85.814,39.5 87.5,39.5
  pour cut-out: 84.53,39.316 86,39.316 86,40.75
  pour cut-out: 78.708,36.75 78.708,34.04 77.53,34.04
  pour cut-out: 78.708,36.75 78.708,38.862 77.729,38.862
  pour cut-out: 80.269,37.954 77.729,37.954 77.729,38.862
  pour cut-out: 80.269,39.77 77.729,39.77 77.729,38.862
  pour cut-out: 59.78,40.021 62.32,40.021 62.32,38.71
  pour cut-out: 80.269,42.631 82.809,42.631 82.809,43.942
  pour cut-out: 82.809,45.253 80.269,45.253 80.269,43.942
  pour cut-out: 86.723,9.65 86.723,7.5 87.5,7.5
  pour cut-out: 91.277,9.65 91.277,7.5 90.75,7.5
  pour cut-out: 40.204,25.366 41.423,25.366 41.423,24.318
  pour cut-out: 37.48,26.5 37.48,28.75 38.75,28.75
  pour cut-out: 39.51,25.99 37.99,25.99 37.99,26.5
  pour cut-out: 91.034,4.859 96,4.859 96,5.589
  pour cut-out: 108.04,5.5 108.04,3.25 108.25,3.25
  pour cut-out: 39,26.5 39,29 42,29
  pour cut-out: 36.842,28.06 41.78,28.06 41.78,29.123
  pour cut-out: 29.063,28.324 36.75,28.324 36.75,29
  pour cut-out: 48.79,3.419 48.79,1.5 49.5,1.5
  pour cut-out: 48.79,3.419 48.79,5.959 49.899,5.959
  pour cut-out: 79,10.334 81.25,10.334 81.25,11.25
  pour cut-out: 81.413,12.597 81.413,14.25 81.25,14.25
  pour cut-out: 80.703,13.067 79,13.067 79,11.443
  pour cut-out: 80.109,11.443 80.109,13.25 79.5,13.25
  pour cut-out: 76.46,10.334 79,10.334 79,11.443
  pour cut-out: 75.351,11.443 75.351,13.25 76.5,13.25
  pour cut-out: 69.56,8.25 69.56,7.5 69.25,7.5
  pour cut-out: 69.56,8.25 69.56,9.945 69.195,9.945
  pour cut-out: 40.13,36.76 42.8,36.76 42.8,36.25
  pour cut-out: 60.059,2.31 60.059,0.5 58.75,0.5
  pour cut-out: 58.95,3.419 58.95,2.25 59,2.25
  pour cut-out: 58.95,3.419 58.95,5.959 60.059,5.959
  pour cut-out: 61.168,3.419 61.168,5.959 60.059,5.959
  pour cut-out: 39.51,27.01 41.6,27.01 41.6,26.75
  pour cut-out: 49,24.19 46.5,24.19 46.5,24.5
  pour cut-out: 49.51,24.7 49.51,27.5 49,27.5
  pour cut-out: 40.894,26.75 40.894,24.318 41.423,24.318
  pour cut-out: 40.894,26.75 40.894,28.96 41.78,28.96
  pour cut-out: 40.872,28.96 40.872,30.75 41.75,30.75
  pour cut-out: 55.608,34.04 55.608,32.5 55.25,32.5
  pour cut-out: 53.792,34.04 53.792,32.75 54.5,32.75
  pour cut-out: 49.918,34.45 49.918,33 49.25,33
  pour cut-out: 58.872,34.04 58.872,32.5 59.5,32.5
  pour cut-out: 58.872,34.04 58.872,35.25 59.5,35.25
  pour cut-out: 56.49,35.74 58,35.74 58,36.25
  pour cut-out: 66.883,37.956 65.25,37.956 65.25,37.25
  pour cut-out: 65.768,38.71 65.768,36.25 65.25,36.25
  pour cut-out: 65.094,36.25 65.094,35.25 65.5,35.25
  pour cut-out: 67.918,34.45 67.918,32.75 67.25,32.75
  pour cut-out: 67.918,34.45 67.918,36.25 67.55,36.25
  pour cut-out: 71.542,34.04 71.542,32.75 72,32.75
  pour cut-out: 73.358,34.04 73.358,32.75 72.75,32.75
  pour cut-out: 76.622,34.04 76.622,33 77.25,33
  pour cut-out: 78.506,36.75 78.506,34.04 77.53,34.04
  pour cut-out: 76.622,34.04 76.622,35.25 77.25,35.25
  pour cut-out: 74.36,35.74 75.88,35.74 75.88,36.25
  pour cut-out: 78.506,36.75 78.506,38.862 77.729,38.862
  pour cut-out: 48.79,5.959 48.79,9.75 49.232,9.75
  pour cut-out: 49.899,4.85 90.539,4.85 90.539,5.959
  pour cut-out: 57.75,15.25 59.75,15.25 59.75,14 58.25,14
  pour cut-out: 56.5,10.46 52.75,10.46 52.75,10
  pour cut-out: 61.159,11.95 61.159,8.75 59.25,8.75
  pour cut-out: 67.391,24.316 64.5,24.316 64.5,25.75
  pour cut-out: 40.872,34.04 40.872,35.509 41.241,35.509
  pour cut-out: 40.872,34.04 40.872,30.5 42.5,30.5
  pour cut-out: 26.523,28.324 29.063,28.324 29.063,29.232
  pour cut-out: 40.515,24.318 40.515,25.5 41.25,25.5
  pour cut-out: 41.423,23.41 46.503,23.41 46.503,24.318
  pour cut-out: 65.739,18.04 65.739,14.75 64.5,14.75
  pour cut-out: 56.3,26.24 58.5,26.24 58.5,26.75
  pour cut-out: 58.892,24.42 58.892,26.81 60.3,26.81
  pour cut-out: 59.8,23.512 64.88,23.512 64.88,24.42
  pour cut-out: 67.901,24.826 67.901,27.5 66.75,27.5
  pour cut-out: 84.933,24.225 82.25,24.225 82.25,25.75
  pour cut-out: 77.49,23.512 82.57,23.512 82.57,24.419
  pour cut-out: 76.582,24.42 76.582,26.75 77.8,26.75
  pour cut-out: 73.92,26.24 75.82,26.24 75.82,26.75
  pour cut-out: 83.518,28.96 83.518,34.04 82.61,34.04
  pour cut-out: 83.47,33.59 83.47,28.96 82.61,28.96
  pour cut-out: 85.25,33.94 82.5,33.94 82.5,35.25
  pour cut-out: 76.821,38.862 76.821,37.22 77.51,37.22
  pour cut-out: 53.8,39.61 64.86,39.61 64.86,38.71